# Altium PCB HFPB_01-PCB.PcbDoc (part 5 of 5)
Units mm, origin at the board's own origin, x right, y up, seen from the top; angles counter-clockwise.
Board outline 125 x 200 mm, 8 copper layers (Top Layer, Signal Layer 1, Signal Layer 2, Signal Layer 3, Signal Layer 4, Signal Layer 5, Signal Layer 6, Bottom Layer), stack 1.53 mm thick; 382 components, 179 nets, 1080 pads, 272 vias.
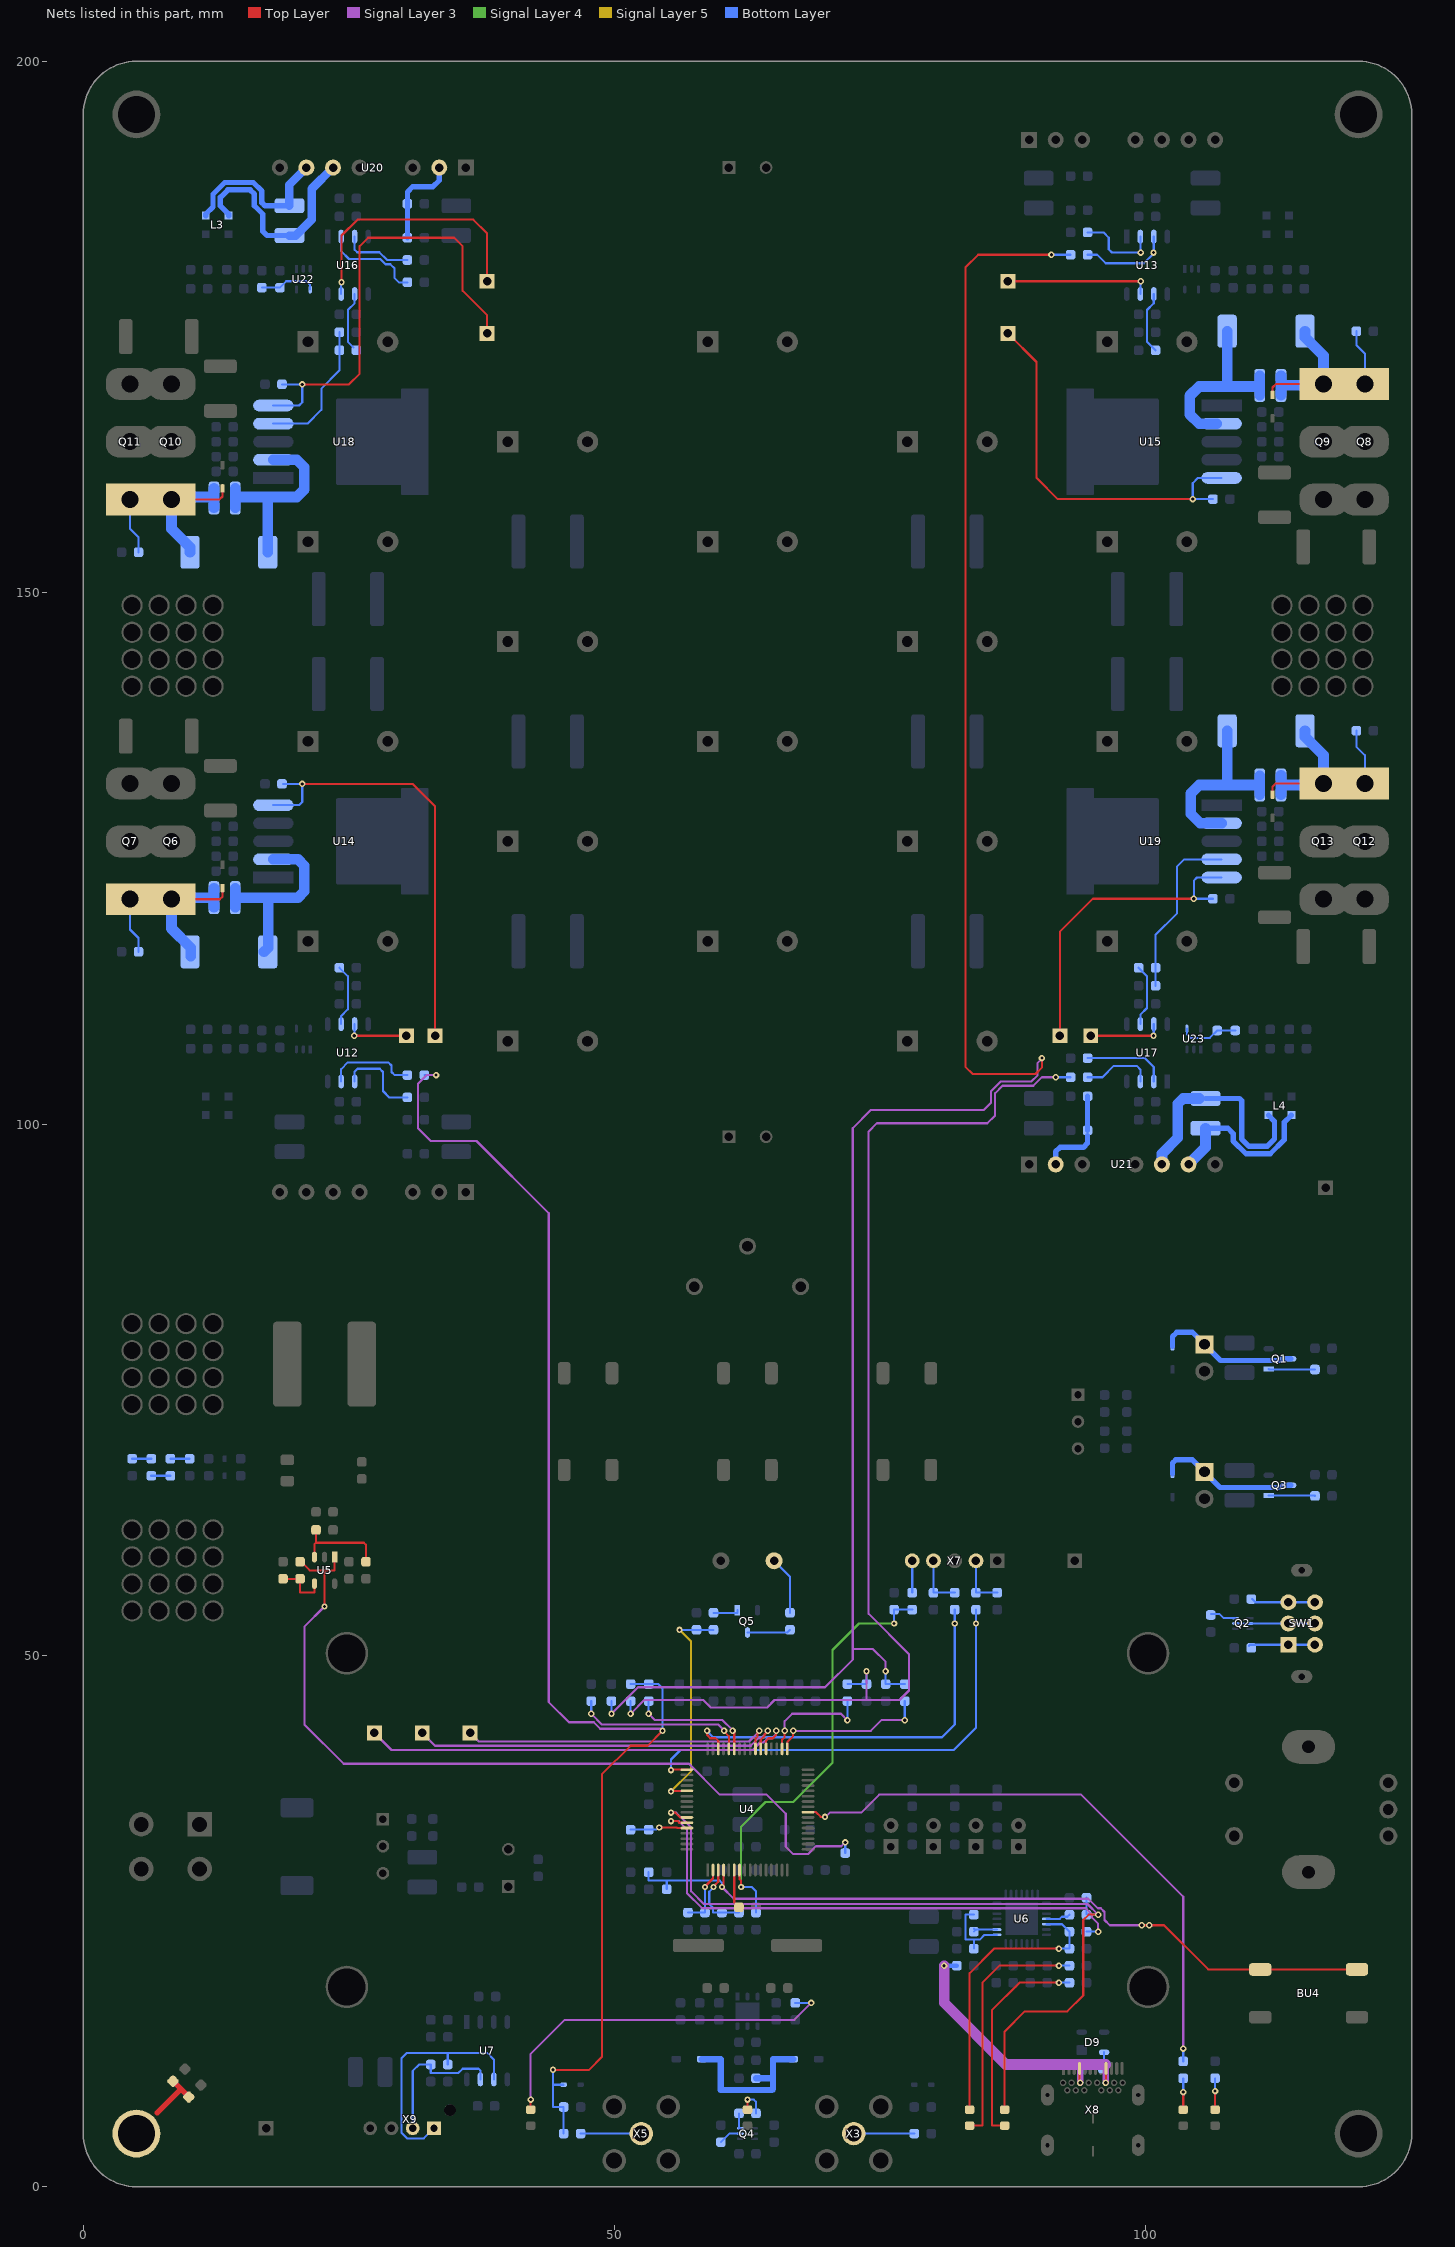
[diagram p10: the nets of this part, all layers, seen from the top]

## Via types
v1: diameter 0.6, hole 0.3, Top Layer to Bottom Layer, tented both sides, 272 vias

## Nets (pads, with @x,y where several pads share a name; then routed paths per layer and width w, separated by ;. In a path a pad name is that pad's centre, name@x,y a point inside that pad or via, vN(x,y) a via of type N, cw(c..) or ccw(c..) an arc to the next point about the centre after c; other vN are vias at no path point) (continued)
NetC114_1: C114.1 R107.2 U18.4 | length 13.1
  Bottom Layer w0.2: U18.4@17.88,165.902 21.102,165.902 22.4,167.2 22.4,169.2 24.1,170.9 C114.1@24.1,174.5
NetC115_1: C115.1 R108.1 U19.4 | length 16.5
  Bottom Layer w0.2: C115.1@100.9,113 R108.1@100.9,114.7 100.9,117.8 102.9,119.8 102.9,124.2 103.598,124.898 U19.4@107.12,124.898
NetC127_1: C127.1 FB14.2 U20.2 | length 9
  Bottom Layer w0.5: FB14.2@30.5,183.4 30.5,186.7 30.5,187.7 31,188.2 32.9,188.2 33.5,188.8 U20.2@33.5,190
NetC128_1: C128.1 L3.1 U20.6 | length 20.6
  Bottom Layer w0.5: L3.1@13.675,185.475 13.675,185.625 12.9,186.4 12.9,187.2 13.6,187.9 15.7,187.9 16.1,187.5 16.1,186.41 16.9,185.61 16.9,184 17.3,183.6 C128.1@19.4,183.6
  Bottom Layer w0.8: C128.1@19.4,183.6 20,183.6 21.5,185.1 21.5,188 U20.6@23.5,190
NetC128_2: C128.2 L3.4 U20.7 | length 15.8
  Bottom Layer w0.5: L3.4@11.525,185.475 11.525,185.625 12.2,186.3 12.2,187.49 13.31,188.6 15.99,188.6 16.8,187.79 16.8,186.7 17.1,186.4 C128.2@19.4,186.4
  Bottom Layer w0.8: C128.2@19.4,186.4 19.4,188.4 U20.7@21,190
NetC129_1: C129.1 L4.1 U21.6 | length 21.8
  Bottom Layer w0.5: C129.1@105.6,102.4 108.8,102.4 109,102.2 109,98.6 109.7,97.9 111.4,97.9 112.1,98.6 112.1,100.25 L4.1@111.525,100.825
  Bottom Layer w1: U21.6@101.5,96.2 101.5,97.198 103,98.698 103,101.9 103.5,102.4 C129.1@105,102.4
NetC129_2: C129.2 L4.4 U21.7 | length 16
  Bottom Layer w0.5: C129.2@105.6,99.6 107.7,99.6 108.2,99.1 108.2,98.41 109.41,97.2 111.69,97.2 113,98.51 113,100.15 L4.4@113.675,100.825
  Bottom Layer w1: U21.7@104,96.2 105.6,97.8 C129.2@105.6,99.6
NetC130_1: C130.1 FB15.2 U21.2 | length 8.4
  Bottom Layer w0.5: U21.2@91.5,96.2 91.5,97.4 91.9,97.8 94.1,97.8 94.5,98.2 94.5,98.9 ; C130.1@94.5,99.4 FB15.2@94.5,102.6
NetC135_1: C135.1 FB16.2 U22.4 | length 5.4
  Bottom Layer w0.2: FB16.2@16.8,178.7 C135.1@18.5,178.7 19.1,179.3 21,179.3 21.35,178.95 U22.4@21.35,178.525
NetC136_1: C136.1 FB17.2 U23.4 | length 5.5
  Bottom Layer w0.2: U23.4@103.85,108.975 103.85,108.45 104.2,108.1 106,108.1 C136.1@106.7,108.8 FB17.2@108.4,108.8
NetD1_A: D1.A Q1.3 X2.1 | length 13.4
  Bottom Layer w0.5: D1.A@102.5,79.1 102.5,80 102.9,80.4 104.37,80.4 X2.1@105.5,79.27 107.02,77.75 112.55,77.75 112.7,77.9 Q1.3@113.65,77.9
NetD3_C: D3.C D4.C FB3.2 | length 15.9
  Bottom Layer w0.6: D4.C@58.2,12 60,12 60,9.1 64.8,9.1 64.9,9.2 64.9,10.2 ; FB3.2@63.3,10.2 64.9,10.2 ; D3.C@66.8,12 64.9,12 64.9,10.2
NetD7_A: D7.A Q3.3 X4.1 | length 13.4
  Bottom Layer w0.5: D7.A@102.5,67.1 102.5,68.1 102.8,68.4 104.37,68.4 X4.1@105.5,67.27 106.97,65.8 112.7,65.8 112.9,66 Q3.3@113.65,66
NetD8_C: D8.C R30.1 R31.2 R32.1 R33.2 R35.1 | length 135
  Top Layer w0.2: v1(44.2,11) 47.6,11 48.8,12.2 48.8,38.8 51.5,41.5 53.1,41.5 v1(54.5,42.9)
  Signal Layer 3 w0.2: v1(33.2,104.6) 32.3,104.6 31.5,103.8 31.5,99.6 32.7,98.4 37,98.4 43.8,91.6 43.8,45.6 45.7,43.7 48.034,43.7 48.634,43.1 54.3,43.1 v1(54.5,42.9)
  Bottom Layer w0.2: R32.1@32.1,104.6 v1(33.2,104.6) ; v1(44.2,11) 44.2,9.6 ; R33.2@45.2,5 R35.1@45.2,7.5 44.2,7.5 44.2,9.6 ; D8.C@45.2,9.6 44.2,9.6 ; R30.1@51.5,47.3 R31.2@53.2,47.3 54.1,47.3 54.5,46.9 v1(54.5,42.9)
NetD10_A: D10.A D12.A Q6.1 Q7.1 R95.2 R97.2 R99.2 | length 25.5
  Top Layer w0.2: Q6.1@8.3,121.15 12.85,121.15 13.1,121.4 D10.A@13.1,122.2
  Bottom Layer w0.2: R99.2@5.2,116.2 5.2,117.5 4.4,118.3 Q7.1@4.4,121.15 6.15,121.15 Q6.1@6.5,120.8 ; Q6.1@8.3,121.15 Q6.1@8.45,121.3 ; R95.2@12.2,120.3 R95.2@12.4,120.1
  Bottom Layer w1: Q6.1@8.3,121.15 8.3,118.4 10.1,116.6 D12.A@10.1,115.8 ; Q6.1@8.45,121.3 12.3,121.3 ; R95.2@12.3,120.4 12.3,121.3 ; R97.2@12.3,122.2 12.3,121.3
NetD11_A: D11.A D13.A Q8.1 Q9.1 R96.1 R98.1 R102.2 | length 22.5
  Top Layer w0.2: D11.A@111.9,168.6 111.9,169.3 112.25,169.65 Q9.1@116.7,169.65
  Bottom Layer w0.2: Q9.1@116.55,169.5 Q9.1@116.7,169.65 ; R102.2@119.8,174.6 119.8,173.3 120.6,172.5 Q8.1@120.6,169.65
  Bottom Layer w1: R96.1@112.7,168.6 112.7,169.5 ; R98.1@112.7,170.4 112.7,169.5 ; D13.A@114.96,174.6 114.96,174.04 116.7,172.3 Q9.1@116.7,169.65 ; Q9.1@116.55,169.5 112.7,169.5
NetD12_C: D12.C R95.1 R97.1 U14.2 | length 19.4
  Bottom Layer w1: R95.1@14.3,120.4 14.3,121.3 ; R97.1@14.3,122.2 14.3,121.3 ; D12.C@17,116.2 17.4,116.6 17.4,121.3 ; U14.2@17.88,124.898 20.202,124.898 20.8,124.3 20.8,121.9 20.2,121.3 17.4,121.3 ; 14.3,121.3 17.4,121.3
NetD13_C: D13.C R96.2 R98.2 U15.2 | length 18.7
  Bottom Layer w1: U15.2@106.65,165.902 104.998,165.902 104.1,166.8 104.1,168.5 105,169.4 107.85,169.4 ; D13.C@107.64,174.6 107.64,169.61 107.85,169.4 ; R96.2@110.7,168.6 110.7,169.4 ; R98.2@110.7,170.4 110.7,169.4 ; 107.85,169.4 110.7,169.4
NetD14_A: D14.A D16.A Q10.1 Q11.1 R109.2 R111.2 R113.2 | length 22.5
  Top Layer w0.2: Q10.1@8.3,158.75 12.8,158.75 13.1,159.05 D14.A@13.1,159.8
  Bottom Layer w0.2: Q11.1@4.4,158.75 4.4,156 5.2,155.2 R113.2@5.2,153.8
  Bottom Layer w1: D16.A@10.04,153.8 10.04,154.26 8.3,156 Q10.1@8.3,158.75 8.55,159 12.3,159 ; R109.2@12.3,158 12.3,159 ; R111.2@12.3,159.8 12.3,159
NetD15_A: D15.A D17.A Q12.1 Q13.1 R110.1 R112.1 R116.2 | length 22.5
  Top Layer w0.2: D15.A@111.9,131 111.9,131.75 112.2,132.05 Q13.1@116.7,132.05
  Bottom Layer w0.2: Q13.1@116.55,131.9 Q13.1@116.7,132.05 ; R116.2@119.8,137 119.8,135.5 120.6,134.7 Q12.1@120.6,132.05
  Bottom Layer w1: R112.1@112.7,131 112.7,131.9 ; R110.1@112.7,132.8 112.7,131.9 ; D17.A@114.96,137 114.96,136.44 116.7,134.7 Q13.1@116.7,132.05 ; Q13.1@116.55,131.9 112.7,131.9
NetD16_C: D16.C R109.1 R111.1 U18.2 | length 18.6
  Bottom Layer w1: R109.1@14.3,158 R111.1@14.3,159.8 ; 14.8,159 17.36,159 ; D16.C@17.36,153.8 17.36,159 ; U18.2@17.88,162.498 20.102,162.498 20.8,161.8 20.8,159.7 20.1,159 17.36,159
NetD17_C: D17.C R110.2 R112.2 U19.2 | length 18.9
  Bottom Layer w0.2: R110.2@110.7,132.763 R110.2@110.7,132.8
  Bottom Layer w1: U19.2@107.12,128.302 105.098,128.302 104.2,129.2 104.2,131.1 105,131.9 107.64,131.9 ; D17.C@107.64,137 107.64,131.9 ; R112.2@110.7,131 110.7,131.9 ; R110.2@110.7,132.763 110.7,131.9 ; 107.64,131.9 110.7,131.9
NetLD1_A: LD1.A R19.2 | length 35.1
  Top Layer w0.2: LD1.A@42.1,7.25 v1(42.1,8.2)
  Signal Layer 3 w0.2: v1(42.1,8.2) 42.1,12.5 45.3,15.7 66.9,15.7 v1(68.5,17.3)
  Bottom Layer w0.2: R19.2@67,17.3 v1(68.5,17.3)
NetLD2_A: LD2.A R37.2 | length 2.9
  Top Layer w0.2: LD2.A@62.5,7.25 v1(62.5,8.2)
  Bottom Layer w0.2: v1(62.5,8.2) 63.1,8.2 63.3,8 R37.2@63.3,6.9
NetLD3_A: LD3.A R51.2 | length 3
  Top Layer w0.2: LD3.A@103.499,7.25 v1(103.5,8.9)
  Bottom Layer w0.2: v1(103.5,8.9) R51.2@103.5,10.2
NetLD4_A: LD4.A R52.2 | length 3
  Top Layer w0.2: LD4.A@106.499,7.25 v1@106.499,8.999
  Bottom Layer w0.2: v1(106.5,9) R52.2@106.5,10.2
NetLD5_A: LD5.A R59.1 | length 23.4
  Top Layer w0.2: LD5.A@83.5,5.75 84.6,5.75 84.6,19.2 86.2,20.8 v1(91.8,20.8)
  Bottom Layer w0.2: v1(91.8,20.8) R59.1@92.8,20.8
NetLD5_C: LD5.C R58.1 R65.1 U6.26 | length 27.3
  Top Layer w0.2: LD5.C@83.4,7.25 83.4,20.1 85.7,22.4 v1(91.8,22.4)
  Bottom Layer w0.2: U6.26@90.625,24.7 92.1,24.7 R65.1@92.8,24 R58.1@92.8,22.4 v1(91.8,22.4)
NetLD6_A: LD6.A R56.1 | length 20.2
  Top Layer w0.2: LD6.A@86.5,5.75 85.5,5.75 85.5,16.6 88.1,19.2 v1(91.8,19.2)
  Bottom Layer w0.2: v1(91.8,19.2) R56.1@92.8,19.2
NetLS1_N: LS1.N R36.1 | length 5.5
  Bottom Layer w0.2: LS1.N@65,58.9 66.5,57.4 R36.1@66.5,54
NetQ1_1: Q1.1 R8.2 | length 4.4
  Bottom Layer w0.2: Q1.1@111.55,76.95 111.6,76.9 R8.2@115.9,76.9
NetQ2_2: Q2.2 Q2.5 SW1.2 SW1.5 | length 7.4
  Bottom Layer w0.2: Q2.5@108.425,53 Q2.2@109.775,53 ; Q2.2@109.855,53 SW1.2@113.4,53 SW1.5@115.9,53
NetQ2_6: Q2.6 R20.1 | length 2.5
  Bottom Layer w0.2: R20.1@106.1,53.9 106.9,53.9 107.3,53.5 Q2.6@108.425,53.5
NetQ3_1: Q3.1 R21.2 | length 4.4
  Bottom Layer w0.2: Q3.1@111.55,65.05 115.85,65.05 R21.2@115.9,65
NetQ4_2: Q4.2 R39.2 | length 2.2
  Bottom Layer w0.2: R39.2@60,4.2 60.8,5 Q4.2@61.825,5
NetQ4_3: Q4.3 R37.1 | length 1.5
  Bottom Layer w0.2: R37.1@61.7,6.9 61.7,5.5 Q4.3@61.825,5.5
NetQ5_1: Q5.1 R38.2 | length 2.5
  Bottom Layer w0.2: R38.2@59.3,54 61.55,54 Q5.1@61.55,54.25
NetQ5_3: Q5.3 R36.2 | length 4.1
  Bottom Layer w0.2: Q5.3@62.5,52.15 66.25,52.15 R36.2@66.5,52.4
NetR1_1: R1.1 R4.2 | length 1.8
  Bottom Layer w0.2: R1.1@4.6,68.5 R4.2@6.4,68.5
NetR3_2: R3.2 R5.2 R6.1 R9.2 | length 199.6
  Top Layer w0.2: v1(90.2,106.2) 90.2,105.3 89.6,104.7 83.7,104.7 83,105.4 83,180.6 84.2,181.8 v1(91.1,181.8)
  Signal Layer 3 w0.2: v1(49.7,44.5) 52.2,47 69.8,47 72.4,49.6 72.4,50.6 ; v1(75.5,48.5) 75.5,49.4 74.3,50.6 72.4,50.6 ; v1(90.2,106.2) 90.2,106.151 89.8,105.751 89.8,104.6 89.2,104 86.337,104 85.4,103.063 85.4,101.975 84.75,101.325 74.125,101.325 72.4,99.6 72.4,50.6
  Bottom Layer w0.2: v1(49.7,44.5) R9.2@49.7,45.7 ; v1(75.5,48.5) R3.2@75.5,47.3 R5.2@77.3,47.3 ; v1(91.1,181.8) R6.1@92.9,181.8
NetR4_1: R4.1 R7.2 | length 1.8
  Bottom Layer w0.2: R4.1@6.4,66.9 R7.2@8.2,66.9
NetR7_1: R7.1 R11.2 | length 1.8
  Bottom Layer w0.2: R7.1@8.2,68.5 R11.2@10,68.5
NetR15_1: R15.1 X3.1 | length 5.7
  Bottom Layer w0.2: X3.1@72.5,5 R15.1@78.2,5
NetR18_1: R18.1 SW1.1 SW1.4 | length 6.2
  Bottom Layer w0.2: R18.1@109.7,50.9 109.8,51 SW1.1@113.4,51 SW1.4@115.9,51
NetR23_2: R23.2 R26.2 R27.1 R30.2 | length 111.1
  Signal Layer 3 w0.2: v1(51.5,44.5) 52.8,45.8 58.351,45.8 59.051,45.1 59.549,45.1 64.349,45.1 65.049,45.8 73.7,45.8 ; v1(73.7,48.5) 73.7,45.8 ; v1(91.5,104.4) 90.2,104.4 89.4,103.6 86.503,103.6 85.8,102.897 85.8,100.8 85.075,100.075 74.675,100.075 73.9,99.3 73.9,53.9 77.7,50.1 77.7,46.7 76.8,45.8 73.7,45.8
  Bottom Layer w0.2: v1(51.5,44.5) R30.2@51.5,45.7 ; R26.2@71.9,47.3 R23.2@73.7,47.3 v1(73.7,48.5) ; v1(91.5,104.4) R27.1@92.9,104.4
NetR29_1: R29.1 SW1.3 SW1.6 | length 6
  Bottom Layer w0.2: R29.1@110,55.3 110.3,55 SW1.3@113.4,55 SW1.6@115.9,55
NetR33_1: R33.1 X5.1 | length 5.7
  Bottom Layer w0.2: R33.1@46.8,5 X5.1@52.5,5
NetR40_1: R40.1 R44.2 U4.60 | length 5.4
  Top Layer w0.2: v1(54.2,33.8) 55.85,33.8 55.9,33.75 U4.60@56.8,33.75
  Bottom Layer w0.2: R44.2@51.5,33.6 R40.1@53.2,33.6 53.9,33.6 54.1,33.8 v1(54.2,33.8)
NetR42_1: R42.1 R45.1 U5.3 | length 9
  Top Layer w0.2: U5.3@21.75,59.25 21.75,60.45 21.9,60.6 ; R45.1@21.9,61.8 21.9,60.6 ; R42.1@26.6,58.8 26.6,60.4 26.4,60.6 21.9,60.6
NetR43_2: R43.2 R48.1 U5.1 | length 79.3
  Top Layer w0.2: R48.1@20.4,58.8 20.5,58.8 21.3,58 22.7,58 ; v1(22.7,54.6) 22.7,58 ; U5.1@23.65,59.25 23.65,58 22.7,58
  Signal Layer 3 w0.2: v1(22.7,54.6) 20.8,52.7 20.8,43.5 24.5,39.8 57,39.8 59.9,36.9 64.3,36.9 66.1,35.1 66.1,32 66.8,31.3 68.2,31.3 68.94,32.04 71.34,32.04 v1(71.7,32.4)
  Bottom Layer w0.2: R43.2@71.7,31.4 v1(71.7,32.4)
NetR46_1: R46.1 R50.1 X7.4 | length 5
  Bottom Layer w0.2: X7.4@80,58.9 R46.1@80,55.9 R50.1@82,55.9
NetR47_1: R47.1 R54.2 X7.2 | length 5
  Bottom Layer w0.2: X7.2@84,58.9 R47.1@84,55.9 R54.2@86,55.9
NetR48_2: R48.2 R49.2 U5.4 | length 5.1
  Top Layer w0.2: R49.2@18.8,57.2 R48.2@20.4,57.2 20.4,55.9 21.75,55.9 U5.4@21.75,56.75
NetR53_1: R53.1 X7.5 | length 3
  Bottom Layer w0.2: R53.1@78,55.9 X7.5@78,58.9
NetR60_2: R60.2 R62.1 U6.8 | length 7.2
  Bottom Layer w0.2: R60.2@83.8,22.4 83.8,23.25 ; R62.1@83.8,25.6 83,25.6 83,23.25 83.8,23.25 ; U6.8@85.975,23.7 84.8,23.7 84.35,23.25 83.8,23.25
NetR61_2: R61.2 U6.9 | length 2.4
  Bottom Layer w0.2: R61.2@83.8,24 84,24.2 U6.9@85.975,24.2 ; R61.2@83.8,24.3 R61.2@83.9,24.2
NetR64_2: R64.2 U4.6 | length 3.7
  Top Layer w0.2: U4.6@61.25,29.8 61.25,26.75 R64.2@61.7,26.3
NetR66_1: R66.1 U6.25 | length 2.3
  Bottom Layer w0.2: U6.25@90.625,25.2 91.9,25.2 92.1,25.4 92.6,25.4 R66.1@92.8,25.6
NetR69_1: R69.1 U7.7 X9.2 | length 13.9
  Bottom Layer w0.2: X9.2@31,5.5 31,10.9 31.6,11.5 R69.1@32.7,11.5 32.7,10.7 35.3,10.7 35.7,11.1 37.2,11.1 37.365,10.935 U7.7@37.365,10.1
NetR70_1: R70.1 U7.6 X9.1 | length 22.8
  Bottom Layer w0.2: X9.1@33,5.5 32.05,4.55 30.463,4.55 29.95,5.063 29.95,12.083 30.467,12.6 34.3,12.6 ; R70.1@34.3,11.5 34.3,12.6 ; U7.6@38.635,10.1 38.635,11.965 38,12.6 34.3,12.6
NetR89_1: R89.1 TP7.1 U14.5 | length 41.3
  Top Layer w0.2: v1(20.6,132) 31,132 33.1,129.9 TP7.1@33.1,108.3
  Bottom Layer w0.2: U14.5@17.88,130.004 20.304,130.004 20.6,130.3 v1(20.6,132) R89.1@18.8,132
NetR90_2: R90.2 TP9.1 U15.5 | length 36.6
  Top Layer w0.2: TP9.1@87,174.4 89.7,171.7 89.7,160.8 91.7,158.8 v1(104.4,158.8)
  Bottom Layer w0.2: R90.2@106.3,158.8 v1(104.4,158.8) 104.4,160.3 104.896,160.796 U15.5@107.12,160.796
NetR91_2: R91.2 U12.2 | length 8.2
  Bottom Layer w0.2: U12.2@25.535,104 25.535,104.935 25.8,105.2 27.9,105.2 28.2,104.9 28.2,103.1 28.8,102.5 R91.2@30.5,102.5
NetR92_2: R92.2 U13.2 | length 7.9
  Bottom Layer w0.2: R92.2@94.5,183.9 96,183.9 96.5,183.4 96.5,182.3 96.8,182 v1(99.5,182) 99.465,182.035 U13.2@99.465,183.5
NetR93_1: R93.1 U12.6 | length 5.9
  Bottom Layer w0.2: R93.1@24.1,114.7 24.9,113.9 24.9,110.8 24.265,110.165 U12.6@24.265,109.4
NetR94_2: R94.2 U13.6 | length 5.9
  Bottom Layer w0.2: U13.6@100.735,178.1 100.735,177.235 100.1,176.6 100.1,173.6 R94.2@100.9,172.8
NetR103_1: R103.1 TP12.1 U18.5 | length 43.8
  Top Layer w0.2: v1(20.6,169.6) 25,169.6 26,170.6 26,182.6 26.8,183.4 34.9,183.4 35.7,182.6 35.7,178.4 38,176.1 TP12.1@38,174.4
  Bottom Layer w0.2: U18.5@17.88,167.604 20.304,167.604 20.6,167.9 v1(20.6,169.6) R103.1@18.7,169.6
NetR104_2: R104.2 TP13.1 U19.5 | length 29.9
  Top Layer w0.2: TP13.1@91.9,108.3 91.9,118.1 95,121.2 v1(104.5,121.2)
  Bottom Layer w0.2: R104.2@106.3,121.2 v1(104.5,121.2) 104.5,122.9 104.796,123.196 U19.5@107.12,123.196
NetR105_2: R105.2 U16.2 | length 9.3
  Bottom Layer w0.2: U16.2@24.265,183.5 24.265,182.135 25,181.4 27.934,181.4 28.434,180.9 28.9,180.9 29.3,180.5 29.3,179.6 29.7,179.2 R105.2@30.5,179.2
NetR106_2: R106.2 U17.2 | length 7.9
  Bottom Layer w0.2: R106.2@94.5,106.2 99.9,106.2 100.735,105.365 U17.2@100.735,104
NetR107_1: R107.1 U16.6 | length 5.5
  Bottom Layer w0.2: R107.1@25.417,173.083 24.9,173.6 24.9,176.6 25.535,177.235 U16.6@25.535,178.1
NetR108_2: R108.2 U17.6 | length 5.9
  Bottom Layer w0.2: R108.2@99.3,114.7 100.1,113.9 100.1,110.91 99.465,110.275 U17.6@99.465,109.4
NetTP1_1: TP1.1 U4.37 | length 41.7
  Top Layer w0.2: U4.37@64.25,41.2 64.25,41.95 64.5,42.2 64.9,42.2 65.2,42.5 v1(65.2,42.9)
  Signal Layer 3 w0.2: TP1.1@27.4,42.7 29,41.1 62.98,41.1 63.68,41.8 64,41.8 64.4,42.2 64.8,42.2 65.2,42.6 v1(65.2,42.9)
NetTP2_1: TP2.1 U4.38 | length 35.6
  Top Layer w0.2: U4.38@63.75,41.2 63.75,42.05 64.1,42.4 64.1,42.551 64.4,42.851 v1(64.4,42.9)
  Signal Layer 3 w0.2: TP2.1@31.9,42.7 33.1,41.5 62.814,41.5 63.514,42.2 63.757,42.2 64.4,42.843 v1(64.4,42.9)
NetTP3_1: TP3.1 U4.39 | length 29.8
  Top Layer w0.2: U4.39@63.25,41.2 63.25,42.184 63.45,42.384 63.45,42.75 v1(63.6,42.9)
  Signal Layer 3 w0.2: TP3.1@36.4,42.7 37.2,41.9 62.649,41.9 63.6,42.851 v1(63.6,42.9)
NetTP8_1: TP8.1 U12.7 | length 6
  Top Layer w0.2: v1(25.5,108.3) TP8.1@30.4,108.3
  Bottom Layer w0.2: v1@25.535,108.3 U12.7@25.535,109.4
NetTP10_1: TP10.1 U13.7 | length 14.2
  Top Layer w0.2: TP10.1@87,179.5 TP10.1@87,179.3 v1(99.5,179.3)
  Bottom Layer w0.2: U13.7@99.465,178.1 99.465,179.465 99.5,179.43 v1(99.5,179.3)
NetTP11_1: TP11.1 U16.7 | length 24.9
  Top Layer w0.2: v1(24.3,179.2) 24.3,183.6 25.8,185.1 36.7,185.1 38,183.8 TP11.1@38,179.3
  Bottom Layer w0.2: U16.7@24.265,178.1 v1@24.265,179.2
NetTP14_1: TP14.1 U17.7 | length 7.3
  Top Layer w0.2: TP14.1@94.8,108.3 v1(100.7,108.3)
  Bottom Layer w0.2: v1(100.7,108.3) 100.7,108.17 100.735,108.135 U17.7@100.735,109.4
NRST: C32.2 R53.2 R63.2 U4.7 | length 42.5
  Top Layer w0.2: U4.7@61.75,29.8 61.75,28.95 61.9,28.8 v1(61.9,28.2) v1@61.8,28.2
  Signal Layer 4 w0.2: v1(61.9,28.2) 61.9,33.9 64.2,36.2 66.8,36.2 70.5,39.9 70.5,50.5 73,53 v1(76.3,53)
  Bottom Layer w0.2: v1(61.9,28.2) 62.9,28.2 63.3,27.8 R63.2@63.3,25.8 ; v1(76.3,53) C32.2@76.3,54.3 R53.2@78,54.3
OUT-DIS: C15.1 R17.2 U4.3 | length 6.9
  Top Layer w0.2: v1(59.3,28.2) 59.4,28.3 59.4,28.348 59.75,28.699 U4.3@59.75,29.8
  Bottom Layer w0.2: v1(59.3,28.2) 59.3,28.151 58.9,27.751 58.9,26.59 59.25,26.24 59.25,25.8 C15.1@60.1,25.8 R17.2@61.7,25.8
PWM_HighLeft_MC: R31.1 U4.43 | length 11.6
  Top Layer w0.2: v1(61.1,42.9) 61.2,42.9 61.25,42.85 U4.43@61.25,41.2
  Signal Layer 3 w0.2: v1(53.2,44.5) 53.8,43.9 60.149,43.9 61.1,42.949 v1(61.1,42.9)
  Bottom Layer w0.2: v1(53.2,44.5) R31.1@53.2,45.7
PWM_HighRight_MC: R5.1 U4.33 | length 14.6
  Top Layer w0.2: U4.33@66.25,41.2 66.25,41.85 66.8,42.4 v1(66.8,42.9)
  Signal Layer 3 w0.2: v1(66.8,42.9) 74.1,42.9 75.1,43.9 v1(77.3,43.9)
  Bottom Layer w0.2: v1(77.3,43.9) R5.1@77.3,45.7
PWM_HL: R32.2 U12.3 | length 8.5
  Bottom Layer w0.2: U12.3@24.265,104 24.265,105.165 24.9,105.8 28.7,105.8 29,105.5 29,104.9 29.3,104.6 R32.2@30.5,104.6
PWM_HR: R6.2 U13.3 | length 8.5
  Bottom Layer w0.2: R6.2@94.5,181.8 95.4,181.8 96.2,181 99.8,181 100.7,181.9 v1(100.7,182) 100.735,182.035 U13.3@100.735,183.5
PWM_LL: R12.2 U16.3 | length 6.6
  Bottom Layer w0.2: U16.3@25.535,183.5 25.535,182.265 25.765,182.035 27.865,182.035 28.6,181.3 R12.2@30.5,181.3
PWM_LowLeft_MC: R10.1 U4.44 | length 16.3
  Top Layer w0.2: v1(60.3,42.9) 60.3,42.851 60.75,42.401 U4.44@60.75,41.2
  Signal Layer 3 w0.2: v1(47.8,44.5) 48.8,43.5 59.749,43.5 60.1,43.149 60.1,43.1 v1(60.3,42.9)
  Bottom Layer w0.2: v1(47.8,44.5) R10.1@47.8,45.7
PWM_LowRight_MC: R26.1 U4.34 | length 10.9
  Top Layer w0.2: U4.34@65.75,41.2 65.75,42.05 66,42.3 v1(66,42.9)
  Signal Layer 3 w0.2: v1(66,42.9) 66,43.8 66.7,44.5 71.3,44.5 v1(71.9,43.9)
  Bottom Layer w0.2: v1(71.9,43.9) R26.1@71.9,45.7
PWM_LR: R27.2 U17.3 | length 6.7
  Bottom Layer w0.2: R27.2@94.5,104.4 95.9,104.4 96.965,105.465 99.135,105.465 99.465,105.135 U17.3@99.465,104
RXD: R65.2 U4.59 | length 51.4
  Top Layer w0.2: v1@55.3,34.3 v1(55.3,34.4) 55.934,34.4 56.084,34.25 U4.59@56.8,34.25
  Signal Layer 3 w0.2: v1(55.3,34.4) 56.034,34.4 56.8,33.634 56.8,27.634 58.234,26.2 94.334,26.2 94.9,25.634 94.9,25.351 95.5,24.751 v1(95.5,24)
  Bottom Layer w0.2: R65.2@94.4,24 v1(95.5,24)
Shield: C44.1 H1.1 R84.1 | length 5.3
  Top Layer w0.5: 6.95,6.95 9.184,9.184 ; R84.1@8.434,9.934 9.184,9.184 ; C44.1@9.934,8.434 9.184,9.184
SND-ON: R38.1 R41.2 U4.53 | length 21.2
  Top Layer w0.2: v1(55.3,37.2) 55.35,37.25 U4.53@56.8,37.25
  Signal Layer 5 w0.2: v1(55.3,37.2) 57.2,39.1 57.2,51.3 v1(56.1,52.4)
  Bottom Layer w0.2: v1(56.1,52.4) R41.2@57.7,52.4 R38.1@59.3,52.4
START/STOP: BU4.3 BU4.4 R80.1 R82.1 U4.4 | length 74
  Top Layer w0.2: v1(60.1,28.2) 60.25,28.35 U4.4@60.25,29.8 ; v1(99.6,24.6) v1(100.3,24.6) 101.7,24.6 105.85,20.45 BU4.4@110.75,20.45 BU4.3@119.85,20.45
  Signal Layer 3 w0.2: v1(60.1,28.2) 61.2,27.1 94.566,27.1 95.466,26.2 95.749,26.2 96.1,25.849 96.1,25.1 96.6,24.6 v1(99.6,24.6)
  Bottom Layer w0.2: R82.1@53.2,29.6 53.2,28.8 54.9,28.8 ; R80.1@54.9,28 54.9,28.8 ; v1(60.1,28.2) 60.1,28.6 59.9,28.8 54.9,28.8
SWCLK: R47.2 U4.49 | length 43.6
  Top Layer w0.2: v1(55.3,39.2) 55.35,39.25 U4.49@56.8,39.25
  Bottom Layer w0.2: v1(55.3,39.2) 55.3,40.2 56.2,41.1 81.9,41.1 84,43.2 v1(84,53) R47.2@84,54.3
SWDIO: R50.2 U4.46 | length 37.3
  Top Layer w0.2: v1(58.7,42.9) 58.7,42.5 59,42.2 59.5,42.2 59.75,41.95 U4.46@59.75,41.2
  Bottom Layer w0.2: v1(58.7,42.9) 58.9,42.7 58.9,42.651 59.251,42.3 59.3,42.3 80.8,42.3 82,43.5 v1(82,53) R50.2@82,54.3
TXD: LD6.C R57.1 R66.2 U4.58 | length 77
  Top Layer w0.2: v1(55.3,35.2) 55.7,35.2 56.15,34.75 U4.58@56.8,34.75 ; LD6.C@86.5,7.25 86.7,7.45 86.7,14.6 88.6,16.5 92.6,16.5 94.1,18 94.1,25.1 94.6,25.6 v1(95.5,25.6)
  Signal Layer 3 w0.2: v1(55.3,35.2) 55.8,35.2 57.2,33.8 57.2,27.8 58.4,26.6 94.5,26.6 v1(95.5,25.6)
  Bottom Layer w0.2: R57.1@94.4,27.2 R66.2@94.4,25.6 v1(95.5,25.6)
USB-PC: C40.1 R68.1 U4.2 | length 5.9
  Top Layer w0.2: v1@58.451,28.2 59.25,28.999 U4.2@59.25,29.8
  Bottom Layer w0.2: R68.1@56.9,25.8 C40.1@58.5,25.8 v1(58.5,28.2)
VBUS: C33.1 D9.4 FB5.1 X8.A4 X8.A9 X8.B4 X8.B9 | length 31.4
  Top Layer w0.2: X8.A4@93.75,11.13 93.75,9.83 X8.B9@93.8,9.78 ; X8.B4@96.2,9.78 96.25,9.83 X8.A9@96.25,11.13
  Signal Layer 3 w0.6: X8.B9@93.8,9.78 93.8,11.4 ; X8.B4@96.2,9.78 96.2,11.5
  Signal Layer 3 w1: v1(81,20.8) 81,17.3 86.8,11.5 96.2,11.5
  Bottom Layer w0.2: D9.4@96.055,12.65 96.055,11.205 C33.1@95.95,11.1 96.2,10.85 X8.B4@96.2,9.78
  Bottom Layer w0.4: v1(81,20.8) FB5.1@82.2,20.8
Warning: R51.1 U4.24 | length 55.8
  Top Layer w0.2: U4.24@68.2,35.25 68.95,35.25 69.4,34.8 v1(69.8,34.8)
  Signal Layer 3 w0.2: v1(69.8,34.8) 69.849,34.8 70.249,35.2 73.2,35.2 74.9,36.9 93.9,36.9 103.5,27.3 v1(103.5,13)
  Bottom Layer w0.2: R51.1@103.5,11.8 v1(103.5,13)
pads on no net: H2.1 H3.1 H4.1 SW1.0 U3.3 U3.5 U4.8 U4.9 U4.10 U4.11 U4.22 U4.23 U4.28 U4.29 U4.30 U4.35 U4.36 U4.40 U4.50 U4.51 U4.52 U4.54 U4.55 U4.57 U6.1 U6.2 U6.10 U6.11 U6.12 U6.13 U6.14 U6.15 U6.16 U6.17 U6.18 U6.19 U6.20 U6.21 U6.22 U6.23 U6.24 U6.27 U6.28 U8.3 U8.5 U8.8 U9.1 U9.3 U10.1 U10.3 U11.3 U11.5 U11.8 U20.3 U20.5 U20.8 U21.3 U21.5 U21.8 U22.1 U22.3 U23.1 U23.3 X8.A2 X8.A3 X8.A5 X8.A8 X8.A10 X8.A11 X8.B2 X8.B3 X8.B5 X8.B8 X8.B10 X8.B11 X9.0

## Polygon pours and split planes (outlines as drawn)
GND on Signal Layer 1 "Top Layer-No Net" (solid, pour order 22): 125,101.7 65.8,101.7 14.9,50.8 0,50.8 0,5 ccw(c5,5) 5,0 120,0 ccw(c120,5) 125,5
+HV on Signal Layer 1 "Top Layer-No Net" (solid, pour order 13): 0,51.5 14.6,51.5 65.5,102.4 125,102.4 125,195 ccw(c120,195) 120,200 5,200 ccw(c5,195) 0,195
+5V_1 on Signal Layer 1 "Top Layer-No Net" (solid, pour order 3): 0,129.4 12.4,129.4 12.4,137 15.2,139.8 15.2,151 12.4,153.8 12.4,167.65 0,167.65 0,151
+5V_3 on Signal Layer 1 "Top Layer-No Net" (solid, pour order 2): 124.97,161.4 112.57,161.4 112.57,153.83 109.77,151.03 109.77,139.83 112.57,137.03 112.57,123.15 124.97,123.15 124.97,139.83
+5V_2 on Signal Layer 2 "Top Layer-No Net" (solid, pour order 14): -0.005,94.5 0.001,67.6 30.695,67.6 65.495,102.4 125,102.4 125,195 ccw(c119.998,194.997) 119.995,200 4.995,200 ccw(c4.995,195) -0.005,195
+3.3V on Signal Layer 2 "Top Layer-No Net" (solid, pour order 27): 125,101.7 65.8,101.7 30.6,66.5 0,66.5 0,5 ccw(c5,5) 5,0 120,0 ccw(c120,5) 125,5
+5V_3 on Signal Layer 2 "Top Layer-No Net" (solid, pour order 9): 124.97,161.4 112.57,161.4 112.57,153.83 109.77,151.03 109.77,139.83 112.57,137.03 112.57,124.43 124.97,124.43 124.97,139.83
+5V_1 on Signal Layer 2 "Top Layer-No Net" (solid, pour order 5): 0,129.4 12.4,129.4 12.4,137 15.2,139.8 15.2,151 12.4,153.8 12.4,167.1 0,167.1 0,151
GND_HV on Signal Layer 2 "Top Layer-No Net" (solid, pour order 1): 21.5,83.31 21.5,71.61 cw(c19.1,71.61) 19.1,69.21 12.2,69.21 4.6,69.21 cw(c4.6,71.61) 2.2,71.61 2.2,83.31 cw(c4.6,83.31) 4.6,85.71 19.1,85.71 cw(c19.1,83.31)
GND on Signal Layer 3 "Top Layer-No Net" (solid, pour order 28): 125,101.7 65.8,101.7 14.9,50.8 0,50.8 0,5 ccw(c5,5) 5,0 120,0 ccw(c120,5) 125,5
+HV on Signal Layer 3 "Top Layer-No Net" (solid, pour order 15): 0,51.5 14.6,51.5 65.5,102.4 125,102.4 125,195 ccw(c120,195) 120,200 5,200 ccw(c5,195) 0,195
+5V_3 on Signal Layer 3 "Top Layer-No Net" (solid, pour order 11): 124.97,161.4 112.57,161.4 112.57,153.83 109.77,151.03 109.77,139.83 112.57,137.03 112.57,123.15 124.97,123.15 124.97,139.83
+5V_1 on Signal Layer 3 "Top Layer-No Net" (solid, pour order 6): 0,129.4 12.4,129.4 12.4,137 15.2,139.8 15.2,151 12.4,153.8 12.4,167.65 0,167.65 0,151
+5V_2 on Signal Layer 4 "Top Layer-No Net" (solid, pour order 16): 0,67.6 30.7,67.6 65.5,102.4 125,102.4 125,195 ccw(c120,195) 120,200 5,200 ccw(c5,195) 0,195
+3.3V on Signal Layer 4 "Top Layer-No Net" (solid, pour order 24): 30.6,66.5 0,66.5 0,5 ccw(c5,5) 5,0 120,0 ccw(c120,5) 125,5 125,101.7 65.8,101.7
+5V_3 on Signal Layer 4 "Top Layer-No Net" (solid, pour order 12): 124.96,161.4 112.56,161.4 112.56,153.84 109.76,151.04 109.76,139.84 112.56,137.04 112.56,124.44 124.96,124.44 124.96,139.84
+5V_1 on Signal Layer 4 "Top Layer-No Net" (solid, pour order 7): 0,129.4 12.4,129.4 12.4,137 15.2,139.8 15.2,151 12.4,153.8 12.4,167.1 0,167.1 0,151
GND_HV on Signal Layer 4 "Top Layer-No Net" (solid, pour order 0): 21.51,83.3 21.51,71.6 cw(c19.11,71.6) 19.11,69.2 12.21,69.2 4.61,69.2 cw(c4.61,71.6) 2.21,71.6 2.21,83.3 cw(c4.61,83.3) 4.61,85.7 19.11,85.7 cw(c19.11,83.3)
+5V_1 on Signal Layer 5 "Top Layer-No Net" (solid, pour order 19): 0,51.5 14.6,51.5 65.5,102.4 125,102.4 125,195 120,200 5,200 0,195
+HV on Signal Layer 5 "Top Layer-No Net" (solid, pour order 17): 0,51.5 14.6,51.5 65.5,102.4 125,102.4 125,195 ccw(c120,195) 120,200 5,200 ccw(c5,195) 0,195
+3.3V on Signal Layer 5 "Top Layer-No Net" (solid, pour order 29): 125,101.7 65.8,101.7 14.9,50.8 0,50.8 0,5 ccw(c5,5) 5,0 120,0 ccw(c120,5) 125,5
+5V_3 on Signal Layer 5 "Top Layer-No Net" (solid, pour order 10): 124.96,161.4 112.56,161.4 112.56,153.84 109.76,151.04 109.76,139.84 112.56,137.04 112.56,123.15 124.96,123.15 124.96,139.84
+5V_1 on Signal Layer 5 "Top Layer-No Net" (solid, pour order 8): 0,129.4 12.4,129.4 12.4,137 15.2,139.8 15.2,151 12.4,153.8 12.4,167.65 0,167.65 0,151
GND on Top Layer "NONET_L-01_P-001" (solid, pour order 26): 0,66.5 0,5 5,0 120,0 ccw(c120,5) 125,5 125,99.8 51.8,99.8 40,88 40,66.5 15.5,66.5
GND_HV on Top Layer "Top Layer-No Net" (solid, pour order 20): 21.5,83.3 21.5,71.6 cw(c19.1,71.6) 19.1,69.2 12.2,69.2 4.6,69.2 cw(c4.6,71.6) 2.2,71.6 2.2,83.3 cw(c4.6,83.3) 4.6,85.7 19.1,85.7 cw(c19.1,83.3)
Shield on Top Layer "Top Layer-No Net" (solid, pour order 23): 0,9 5,9 cw(c5,5) 9,5 9,0 5,0 cw(c5,5) 0,5
+5V_2 on Top Layer "Top Layer-No Net" (solid, pour order 21): 23.6,83.6 23.6,71.6 ccw(c26,71.6) 26,69.2 32.6,69.2 ccw(c32.6,71.6) 35,71.6 35,83.6 ccw(c32.75,83.45) 32.6,85.7 26,85.7 ccw(c25.85,83.45)
GND on Signal Layer 6 "Top Layer-No Net" (solid, pour order 25): 30.6,66.5 0,66.5 0,5 ccw(c5,5) 5,0 120,0 ccw(c120,5) 125,5 125,101.7 65.8,101.7
+5V_2 on Signal Layer 6 "Top Layer-No Net" (solid, pour order 18): 0,67.6 30.7,67.6 65.5,102.4 125,102.4 125,195 ccw(c120,195) 120,200 5,200 ccw(c5,195) 0,195
GND_HV on Signal Layer 6 "Top Layer-No Net" (solid, pour order 4): 21.5,83.31 21.5,71.61 cw(c19.1,71.61) 19.1,69.21 12.2,69.21 4.6,69.21 cw(c4.6,71.61) 2.2,71.61 2.2,83.31 cw(c4.6,83.31) 4.6,85.71 19.1,85.71 cw(c19.1,83.31)
GND on Bottom Layer "NONET_L-01_P-001" (solid, pour order 31): 0,69.5 0,5 ccw(c5,5) 5,0 120,0 ccw(c120,5) 125,5 125,74 125,91.5 101.3,91.5 cw(c101.3,96.8) 96,96.8 96,105.5 29,105.5 29,93.3 ccw(c30.8,93.3) 30.8,91.5 31,91.5 cw(c31,89.2) 33.3,89.2 33.3,73.3 cw(c29.5,73.3) 29.5,69.5

## Other copper
Top Layer:
  pour cut-out: 112.45,50.05 112.45,54.992 112.442,55 113.4,55.958 115.9,55.958 116.858,55 116.858,51 115.9,50.042
  pour cut-out: 59.41,30.9 59.41,30.606 59.75,30.606 63.5,30.606 65.2,30.606 65.2,31.205 65.699,31.201 66.3,30.6 66.3,28.7 66.8,28.2 66.8,27.69 58.5,27.69 58.4,27.79 58.4,30.9
  pour cut-out: 58.7,43.41 66.8,43.41 66.8,42.4 66.25,41.85 66.25,40.394 59.75,40.394 59.21,40.394 59.21,40.1 58.19,40.1 58.19,42.9
  pour cut-out: 69.006,39.25 69.006,37.75 69.047,37.71 69.8,37.71 70.31,37.2 70.31,33 69.687,32.377 68.981,32.377 68.981,31.433 68.958,31.41 67.725,31.419 67.394,31.75 67.394,38.25 67.394,38.79 67.1,38.79 67.1,39 67.394,39.25
  pour cut-out: 23.2,59.95 22.811,59.95 22.8,59.939 22.8,58.561 22.825,58.55 23.2,58.55
  pour cut-out: 91.9,11.93 97.837,11.93 98.107,11.66 98.107,10.09 98.298,9.898 98.298,9.6 97.9,9.191 97.9,9 97.4,8.54 92.56,8.54 92.1,9 92.1,9.191 91.9,9.39 91.7,9.6 91.7,9.898 91.9,10.09
  pour cut-out: 4.59,63.81 ccw(c4.59,61.81) 2.59,61.81 2.59,54.21 ccw(c4.59,54.21) 4.59,52.21 12.29,52.21 ccw(c12.29,54.113) 14.19,54.21 14.19,61.81 ccw(c12.19,61.81) 12.19,63.81
  pour cut-out: 57.606,39.25 57.606,31.806 57.3,31.5 55.4,31.5 cw(c55.4,32.11) 54.79,32.11 54.79,37.2 54.79,39.2 55.3,39.2 55.35,39.25
Signal Layer 3:
  pour cut-out: 4.6,83.2 ccw(c4.6,81.2) 2.6,81.2 2.6,73.6 ccw(c4.6,73.6) 4.6,71.6 12.3,71.6 ccw(c12.3,73.503) 14.2,73.6 14.2,81.2 ccw(c12.2,81.2) 12.2,83.2
Signal Layer 4:
  pour cut-out: 4.58,63.82 ccw(c4.58,61.82) 2.58,61.82 2.58,54.22 ccw(c4.58,54.22) 4.58,52.22 12.28,52.22 ccw(c12.28,54.123) 14.18,54.22 14.18,61.82 ccw(c12.18,61.82) 12.18,63.82
Signal Layer 1:
  pour cut-out: 4.58,83.22 ccw(c4.58,81.22) 2.58,81.22 2.58,73.62 ccw(c4.58,73.62) 4.58,71.62 12.28,71.62 ccw(c12.28,73.523) 14.18,73.62 14.18,81.22 ccw(c12.18,81.22) 12.18,83.22
Signal Layer 2:
  pour cut-out: 4.59,63.81 ccw(c4.59,61.81) 2.59,61.81 2.59,54.21 ccw(c4.59,54.21) 4.59,52.21 12.29,52.21 ccw(c12.29,54.113) 14.19,54.21 14.19,61.81 ccw(c12.19,61.81) 12.19,63.81
Signal Layer 5:
  pour cut-out: 4.59,83.21 ccw(c4.59,81.21) 2.59,81.21 2.59,73.61 ccw(c4.59,73.61) 4.59,71.61 12.29,71.61 ccw(c12.29,73.513) 14.19,73.61 14.19,81.21 ccw(c12.19,81.21) 12.19,83.21
Signal Layer 6:
  pour cut-out: 112.78,150.82 ccw(c112.78,148.82) 110.78,148.82 110.78,141.22 ccw(c112.78,141.22) 112.78,139.22 120.48,139.22 ccw(c120.48,141.123) 122.38,141.22 122.38,148.82 ccw(c120.38,148.82) 120.38,150.82
  pour cut-out: 4.59,150.81 ccw(c4.59,148.81) 2.59,148.81 2.59,141.21 ccw(c4.59,141.21) 4.59,139.21 12.29,139.21 ccw(c12.29,141.113) 14.19,141.21 14.19,148.81 ccw(c12.19,148.81) 12.19,150.81
  pour cut-out: 4.59,63.81 ccw(c4.59,61.81) 2.59,61.81 2.59,54.21 ccw(c4.59,54.21) 4.59,52.21 12.29,52.21 ccw(c12.29,54.113) 14.19,54.21 14.19,61.81 ccw(c12.19,61.81) 12.19,63.81
Bottom Layer:
  pour cut-out: 61.55,17.8 63.45,17.8 63.45,14.95 61.6,14.95 61.55,14.9
  pour cut-out: 112.45,50.05 112.45,54.992 112.442,55 113.4,55.958 115.9,55.958 116.858,55 116.858,51 115.9,50.042
  pour cut-out: 90.7,20.8 85.9,20.8 85.9,21.4 86.3,21.4 86.5,21.6 86.5,21.9 86.8,22.2 89.3,22.2
  pour cut-out: 33.5,33.1 27.8,33.1 27.8,36.1 cw(c28.092,34.468) 29.39,35.5 33.5,35.5
  pour cut-out: 4.59,63.81 ccw(c4.59,61.81) 2.59,61.81 2.59,54.21 ccw(c4.59,54.21) 4.59,52.21 12.29,52.21 ccw(c12.29,54.113) 14.19,54.21 14.19,61.81 ccw(c12.19,61.81) 12.19,63.81

## Silkscreen, mask and mechanical layers (free items; w line width, h text height)
Top Overlay:
  text "GND" at 114.85,95.725 h1.52
  text "CR2032" at 56.8,91 h2
  text "BOOT" at 73.4,68.625 h2 r90
  text "RESET" at 58.425,67.45 h2 r90
  text "POWER OFF" at 42.95,63.95 h2 r90
  text "GND" at 91.25,60.625 h1.52
  text "OUTPUT" at 105.9,47.4 h2.2 r90
  text "ENABLE" at 109.6,47.4 h2.2 r90
  text "START/STOP" at 102.6,23.1 h2.2
  text "INPUT" at 2.9,22.6 h2.2
  text "+24V" at 2.9,19 h2.2
  text "DISPLAY" at 25.1,11.4 h1.52
  text "RxD" at 84.175,9.35 h1.52 r90
  text "TxD" at 87.475,9.25 h1.52 r90
  text "GND" at 15.15,7.225 h1.52
  text "Pulse" at 61.425,5 h1.52 r90
  text "POWER ON" at 40.7,4.975 h1.52 r90
  text "DANGER" at 109.3,4.95 h1.52 r90
  text "WARNING" at 102.225,4.875 h1.52 r90
Bottom Overlay:
  region: 60.6,3.2 59.632,2.906 59.6,2.9 60.3,2.2
  text "HIGH FREQUENCY POWER BOARD" at 90,77.8 h2.8
  text "HFPB-01" at 71,72.2 h2.8
Top Solder:
  region: 0,9 5.2,9 cw(c5.1,5.1) 9,5 9,0 5,0 cw(c5,5) 0,5
Mechanical 1:
  the board outline again, w0.05

## Text inside footprints (layer, text, board x,y; h text height)
LS1: Top Overlay "-" at 68.2,55 h1.5 r90; Top Overlay "+" at 58,55 h1.5 r90; Mechanical 13 "-" at 68.2,54.9 h1.5 r90; Mechanical 13 "+" at 58.23,54.9 h1.5 r90
X2: Top Overlay "1" at 105.1,81.9 h1 r270
X4: Top Overlay "1" at 105.1,69.9 h1 r270